# Altium PCB PCB_Main_Board_v2.0.PcbDoc (part 3 of 5)
Units mil, origin at the board's own origin, x right, y up, seen from the top; angles counter-clockwise.
Board outline 1967.5 x 1574.8 mil, 4 copper layers (Top Layer, Mid Layer 1, Mid Layer 2, Bottom Layer), stack 61.811 mil thick; 225 components, 129 nets, 854 pads, 286 vias.
Unrouted connection lines stored in the file: 2.
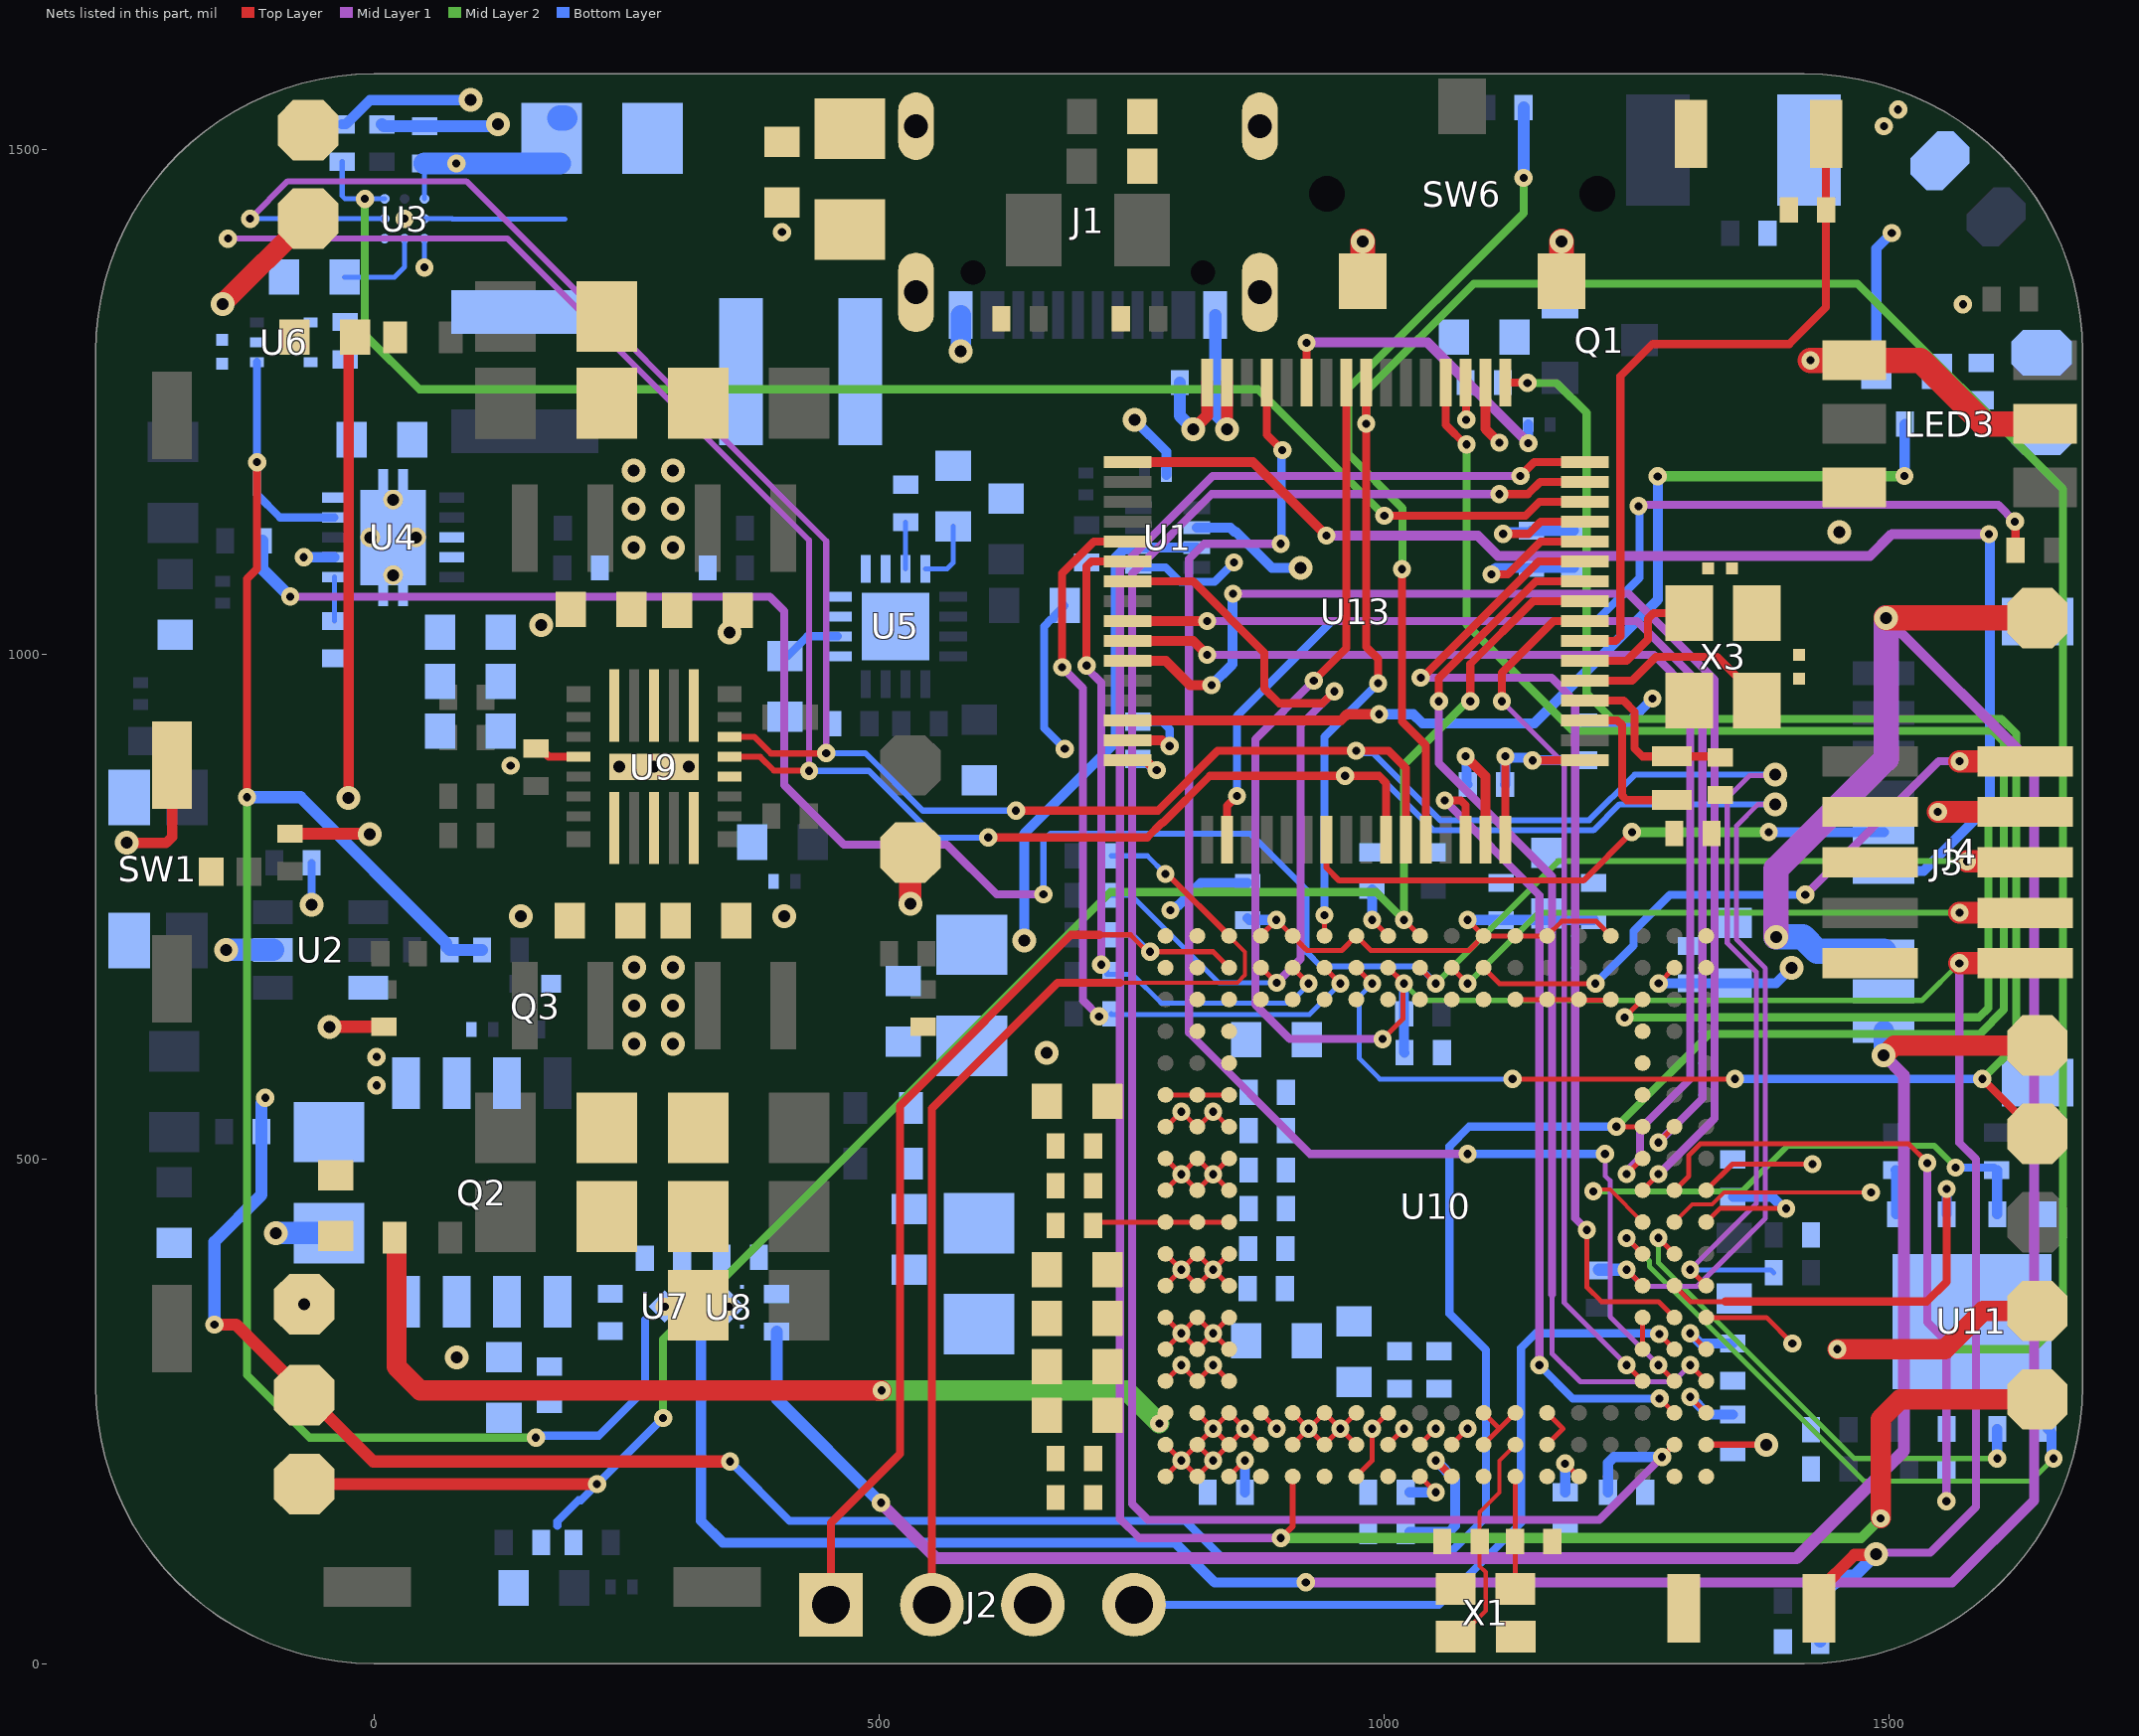
[diagram p4: the nets of this part, all layers, seen from the top]

## Part data (continued)
R2: library part RT0402FRE07510RL, "RES SMD 510 OHM 1% 1/16W 0402", Case/Package=0402, LCSC Part Number=C854355, Manufacturer=Yageo, Max Operating Temperature=125°C, Max Power Dissipation=63mW, Min Operating Temperature=-55°C, Package Quantity=10000, Supplier Part Number=13-RT0402FRE07510RLCT-ND, Temperature Coefficient=50ppm/°C, Tolerance=1%, Voltage Rating (DC)=50V, Category="Chip SMD Resistors", ComponentLink1Description=https://datasheet.ciiva.com/2561/pyu-rt-1-to-0-05-rohs-l-5-2561767.pdf?src-supplier=Digikey, ComponentLink1URL=https://datasheet.ciiva.com/2561/pyu-rt-1-to-0-05-rohs-l-5-2561767.pdf?src-supplier=Digikey, Height=0.014inch, Item Type=Resistor, Lead Free="Lead Free", Length=0.039inch, Manufacturer Part Number=RT0402FRE07510RL, Number of Terminations=2, Packaging="Tape and Reel", Pricing="1=0.1, 10=0.027, 50=0.0224, 100=0.0203, 500=0.0161, 1000=0.01443, 5000=0.01101 (USD)", RoHS=Yes, RoHS Compliant=Yes, Series=RT, Stock=19529, Supplier=Digikey, Width=0.02inch
R3 R5 R11 R15 R16 R38: library part RC0201FR-071KL, "RES 1K OHM 1% 1/20W 0201", Case Code (Imperial)=0201, Case Code (Metric)=0603, LCSC Part Number=C138165, Manufacturer=Yageo, Max Operating Temperature=125°C, Max Power Dissipation=50mW, Min Operating Temperature=-55°C, Package Quantity=10000, Resistance Tolerance=1%, Resistor Type="Thick Film", Supplier Part Number=311-1KMCT-ND, Temperature Coefficient=200ppm/°C, Voltage Rating=25V, Case/Package=0201, Category="Chip SMD Resistors", ComponentLink1Description=https://datasheet.ciiva.com/7672/1563626-7672204.pdf?src-supplier=Element14, ComponentLink1URL=https://datasheet.ciiva.com/7672/1563626-7672204.pdf?src-supplier=Element14, ComponentLink2Description=https://datasheet.ciiva.com/22698/1563626-22698505.pdf?src-supplier=Element14, ComponentLink2URL=https://datasheet.ciiva.com/22698/1563626-22698505.pdf?src-supplier=Element14, ComponentLink3Description=https://datasheet.ciiva.com/29721/pyu-r-int-thick-7-29721196.pdf?src-supplier=Digi-Key, ComponentLink3URL=https://datasheet.ciiva.com/29721/pyu-r-int-thick-7-29721196.pdf?src-supplier=Digi-Key, ComponentLink4Description=https://datasheet.ciiva.com/29721/pyu-r-int-thick-7-29721195.pdf?src-supplier=Digi-Key, ComponentLink4URL=https://datasheet.ciiva.com/29721/pyu-r-int-thick-7-29721195.pdf?src-supplier=Digi-Key, ComponentLink5Description=https://datasheet.ciiva.com/8896/pyu-rc0201-51-rohs-l-8-8896174.pdf?src-supplier=Avnet, ComponentLink5URL=https://datasheet.ciiva.com/8896/pyu-rc0201-51-rohs-l-8-8896174.pdf?src-supplier=Avnet, Construction=Rectangular, Contact Plating=Tin,Matte, Depth=0.3mm, Features="Moisture Resistant", Height=0.01inch, Item Type=Resistor, Lead Free=5697LeadFree, Length=0.024inch, Manufacturer Part Number=RC0201FR-071KL, Military Standard=Not, Number of Terminations=2, Packaging="Tape and Reel", Power Rating=50mW, Pricing="1=0.1, 10=0.027, 50=0.0172, 100=0.0143, 500=0.00988, 1000=0.00854, 5000=0.00629 (USD)", Reach SVHC Compliant=Unknown, RoHS=Yes, RoHS Compliant=Yes, Series=RC, Stock=5606340, Supplier=Digi-Key, Technology="THICK FILM", Termination=SMD/SMT, Tolerance=1%, Voltage Rating (DC)=25V, Width=0.012inch, Working Voltage=25V
R4 R9 R10 R14 R21 R22 R23 R28 R29 R30 R31 R32 R33 R34 R35 R36 R37 R40 R41 R42 R45 R49 R55 R58: library part RC0402FR-0710KL, "RES 10K OHM 1% 1/16W 0402", Case Code (Imperial)=0402, Case Code (Metric)=1005, LCSC Part Number=C60490, Manufacturer=Yageo, Max Operating Temperature=155°C, Max Power Dissipation=63mW, Min Operating Temperature=-55°C, Power Rating=62.5mW, Resistance=10kR, Resistance Tolerance=1%, Resistor Type="Thick Film", Supplier Part Number 1=603-RC0402FR-0710KL, Temperature Coefficient=100ppm/°C, Voltage Rating=50V, Case/Package=0402, Category="Chip SMD Resistors", ComponentLink1Description=https://datasheet.ciiva.com/7660/38568-7660787.pdf?src-supplier=Element14, ComponentLink1URL=https://datasheet.ciiva.com/7660/38568-7660787.pdf?src-supplier=Element14, ComponentLink2Description=https://datasheet.ciiva.com/7849/1686128-7849814.pdf?src-supplier=Element14, ComponentLink2URL=https://datasheet.ciiva.com/7849/1686128-7849814.pdf?src-supplier=Element14, ComponentLink3Description=https://datasheet.ciiva.com/7983/1018594-7983486.pdf?src-supplier=Element14, ComponentLink3URL=https://datasheet.ciiva.com/7983/1018594-7983486.pdf?src-supplier=Element14, ComponentLink4Description=https://datasheet.ciiva.com/22747/1018594-22747512.pdf?src-supplier=Element14, ComponentLink4URL=https://datasheet.ciiva.com/22747/1018594-22747512.pdf?src-supplier=Element14, ComponentLink5Description=https://datasheet.ciiva.com/12667/pyu-rc0402-51-rohs-l-6-r-12667067.pdf?src-supplier=Mouser, ComponentLink5URL=https://datasheet.ciiva.com/12667/pyu-rc0402-51-rohs-l-6-r-12667067.pdf?src-supplier=Mouser, ComponentLink6Description=https://datasheet.ciiva.com/7849/1784430-7849813.pdf?src-supplier=Element14, ComponentLink6URL=https://datasheet.ciiva.com/7849/1784430-7849813.pdf?src-supplier=Element14, ComponentLink7Description=https://datasheet.ciiva.com/7849/1784430-7849815.pdf?src-supplier=Element14, ComponentLink7URL=https://datasheet.ciiva.com/7849/1784430-7849815.pdf?src-supplier=Element14, Construction=Rectangular, Depth=0.5mm, Features="Moisture Resistant", Height=0.32mm, Item Type=Resistor, Lead Free="Lead Free", Lead Pitch=0.2mm, Length=1mm, Manufacturer Part Number=RC0402FR-0710KL, Military Standard=Not, Number of Pins=2, Number of Terminations=2, Packaging="Tape and Reel", Pricing 1="1=0.10000, 10=0.01400, 50=0.01400, 100=0.00500, 1000=0.00300, 10000=0.00200 (USD)", REACH SVHC="No SVHC", RoHS=Yes, RoHS Compliant=Yes, Series=RC, Stock 1=18648329, Supplier 1=Mouser, Termination=SMD/SMT, Tolerance=1%, Voltage Rating (DC)=50V, Width=0.5mm, Working Voltage=50V
R7: library part PA1206FRE470R01Z, "RES 0.01 OHM 1% 1W 1206", Manufacturer=Yageo, Supplier Part Number=7170942, Item Type=Resistors, Manufacturer Part Number=PA1206FRE470R01Z, Pricing="4000=0.152, 8000=0.149, 12000=0.147, 16000=0.146, 20000=0.142 (USD)", RoHS=No, Stock=4000, Supplier="Future Electronics"
R12 R18 R19 R20 R39: library part RC0402FR-074K7L, "RES 4.7K OHM 1% 1/16W 0402", Case Code (Imperial)=0402, Case Code (Metric)=1005, LCSC Part Number=C105871, Manufacturer=Yageo, Max Operating Temperature=155°C, Max Power Dissipation=63mW, Min Operating Temperature=-55°C, Power Rating=62.5mW, Resistance=4.7kR, Resistance Tolerance=1%, Resistor Type="Thick Film", Temperature Coefficient=100ppm/°C, Voltage Rating=50V, Case/Package=0402, Category="Chip SMD Resistors", ComponentLink1Description=https://datasheet.ciiva.com/22661/1686128-22661342.pdf?src-supplier=Element14, ComponentLink1URL=https://datasheet.ciiva.com/22661/1686128-22661342.pdf?src-supplier=Element14, ComponentLink2Description=https://datasheet.ciiva.com/7850/1018594-7850022.pdf?src-supplier=Element14, ComponentLink2URL=https://datasheet.ciiva.com/7850/1018594-7850022.pdf?src-supplier=Element14, ComponentLink3Description=https://datasheet.ciiva.com/7850/1018594-7850023.pdf?src-supplier=Element14, ComponentLink3URL=https://datasheet.ciiva.com/7850/1018594-7850023.pdf?src-supplier=Element14, ComponentLink4Description=https://datasheet.ciiva.com/15215/getdatasheetpartid-328119-15215035.pdf?src-supplier=Verical, ComponentLink4URL=https://datasheet.ciiva.com/15215/getdatasheetpartid-328119-15215035.pdf?src-supplier=Verical, Construction=Rectangular, Depth=0.5mm, Features="Moisture Resistant", Height=0.32mm, Height - Seated (Max)=0.016inch, Item Type=Resistor, Lead Free="Lead Free", Length=1mm, Manufacturer Part Number=RC0402FR-074K7L, Military Standard=Not, Number of Pins=2, Number of Terminations=2, Packaging="Tape and Reel", Pricing 1="10000=0.00085 (USD)", Reach SVHC Compliant=Yes, RoHS=Yes, RoHS Compliant=Yes, Series=RC, Size Code=0402, Stock 1=2420000, Supplier 1=Avnet, Supplier Part Number 1=RC0402FR-074K7L, Termination=SMD/SMT, Tolerance=1%, Voltage Rating (DC)=50V, Width=0.5mm
R13: library part RC0603FR-0720KL, "RES 20K OHM 1% 1/10W 0603", Case Code (Imperial)=0603, Case Code (Metric)=1608, LCSC Part Number=C105575, Manufacturer=Yageo, Max Operating Temperature=155°C, Max Power Dissipation=100mW, Min Operating Temperature=-55°C, Package Quantity=1, Resistance=20kR, Resistance Tolerance=1%, Resistor Type="Thick Film", Temperature Coefficient=100ppm/°C, Voltage Rating=50V, Case/Package=0603, Category="Chip SMD Resistors", ComponentLink1Description=https://datasheet.ciiva.com/11808/0900766b80f96399-11808275.pdf?src-supplier=RSComponents, ComponentLink1URL=https://datasheet.ciiva.com/11808/0900766b80f96399-11808275.pdf?src-supplier=RSComponents, ComponentLink2Description=https://datasheet.ciiva.com/22747/443971-22747525.pdf?src-supplier=Element14, ComponentLink2URL=https://datasheet.ciiva.com/22747/443971-22747525.pdf?src-supplier=Element14, ComponentLink3Description=https://datasheet.ciiva.com/2453/pyu-r-int-thick-7-2453911.pdf?src-supplier=Digi-Key, ComponentLink3URL=https://datasheet.ciiva.com/2453/pyu-r-int-thick-7-2453911.pdf?src-supplier=Digi-Key, ComponentLink4Description=https://datasheet.ciiva.com/2453/pyu-r-int-thick-7-2453912.pdf?src-supplier=Digi-Key, ComponentLink4URL=https://datasheet.ciiva.com/2453/pyu-r-int-thick-7-2453912.pdf?src-supplier=Digi-Key, ComponentLink5Description=https://datasheet.ciiva.com/2453/pyu-r-int-thick-7-2453910.pdf?src-supplier=Digi-Key, ComponentLink5URL=https://datasheet.ciiva.com/2453/pyu-r-int-thick-7-2453910.pdf?src-supplier=Digi-Key, Construction=Rectangular, Depth=0.8mm, Features="Moisture Resistant", Height=0.022inch, Item Type=Resistor, Lead Free="Lead Free", Length=0.063inch, Manufacturer Part Number=RC0603FR-0720KL, Military Standard=Not, Number of Pins=2, Number of Terminations=2, Packaging="Tape and Reel", Power Rating=100mW, Pricing 1="5000=0.00240, 10000=0.00220, 25000=0.00200, 50000=0.00190, 125000=0.00180 (USD)", REACH SVHC="No SVHC", RoHS=Yes, RoHS Compliant=Yes, Series=RC, Size Code=0603, Stock 1=945000, Supplier 1="Arrow Electronics", Supplier Part Number 1=RC0603FR-0720KL, Technology="THICK FILM", Termination=SMD/SMT, Tolerance=1%, Voltage Rating (DC)=50V, Width=0.031inch
R17: library part RC0603FR-071K96L, "RES 1.96K OHM 1% 1/10W 0603", Case Code (Imperial)=0603, Case Code (Metric)=1608, Manufacturer=Yageo, Max Operating Temperature=155°C, Max Power Dissipation=100mW, Min Operating Temperature=-55°C, Supplier Part Number=4765236, Temperature Coefficient=100ppm/°C, Tolerance=1%, Voltage Rating=75V, Voltage Rating (DC)=50V, Case/Package=0603, Category="Chip SMD Resistors", ComponentLink1Description=https://datasheet.ciiva.com/2508/pyu-r-int-thick-7-2508485.pdf?src-supplier=Digikey, ComponentLink1URL=https://datasheet.ciiva.com/2508/pyu-r-int-thick-7-2508485.pdf?src-supplier=Digikey, ComponentLink2Description=https://datasheet.ciiva.com/2508/pyu-r-int-thick-7-2508486.pdf?src-supplier=Digikey, ComponentLink2URL=https://datasheet.ciiva.com/2508/pyu-r-int-thick-7-2508486.pdf?src-supplier=Digikey, ComponentLink3Description=https://datasheet.ciiva.com/2508/pyu-r-int-thick-7-2508487.pdf?src-supplier=Digikey, ComponentLink3URL=https://datasheet.ciiva.com/2508/pyu-r-int-thick-7-2508487.pdf?src-supplier=Digikey, ComponentLink4Description=https://datasheet.ciiva.com/15189/getdatasheetpartid-327907-15189642.pdf?src-supplier=Verical, ComponentLink4URL=https://datasheet.ciiva.com/15189/getdatasheetpartid-327907-15189642.pdf?src-supplier=Verical, Construction=Rectangular, Depth=0.8mm, Features="Moisture Resistant", Height=0.45mm, Lead Free="Lead Free", Length=1.6mm, Manufacturer Part Number=RC0603FR-071K96L, Military Standard=Not, Number of Terminations=2, Packaging="Tape and Reel", Power Rating=100mW, Pricing="5000=0.0015, 50000=0.0014, 150000=0.0014, 375000=0.0013, 1000000=0.0012 (USD)", RoHS=Yes, RoHS Compliant=Yes, Series=RC, Stock=30000, Supplier="Future Electronics", Termination=SMD/SMT, Weight=7.1E-05oz, Width=0.8mm
R24 R25 R26 R27: library part CRCW04023R83FKED, "RES SMD 3.83 OHM 1% 1/16W 0402", Manufacturer="Vishay Dale", Supplier Part Number=71-CRCW04023R83FKED, Voltage Rating (DC)=50V, ComponentLink1Description=https://datasheet.ciiva.com/2464/dcrcwe3-2464766.pdf?src-supplier=Digikey, ComponentLink1URL=https://datasheet.ciiva.com/2464/dcrcwe3-2464766.pdf?src-supplier=Digikey, ComponentLink2Description=https://datasheet.ciiva.com/2464/dcrcwe3-2464767.pdf?src-supplier=Digikey, ComponentLink2URL=https://datasheet.ciiva.com/2464/dcrcwe3-2464767.pdf?src-supplier=Digikey, ComponentLink3Description=https://datasheet.ciiva.com/2464/dcrcwe3-2464765.pdf?src-supplier=Digikey, ComponentLink3URL=https://datasheet.ciiva.com/2464/dcrcwe3-2464765.pdf?src-supplier=Digikey, ComponentLink4Description=https://datasheet.ciiva.com/9076/dcrcwe3-9076442.pdf?src-supplier=Avnet, ComponentLink4URL=https://datasheet.ciiva.com/9076/dcrcwe3-9076442.pdf?src-supplier=Avnet, Item Type=Resistors, Manufacturer Part Number=CRCW04023R83FKED, Pricing="1=0.1, 10=0.023, 50=0.023, 100=0.013, 1000=0.01, 10000=0.005 (USD)", RoHS=Yes, Stock=23660, Supplier=Mouser
R43: library part RC0603FR-071ML, "RES SMD 1M OHM 1% 1/10W 0603", Case Code (Imperial)=0603, Case Code (Metric)=1608, LCSC Part Number=C105578, Manufacturer=Yageo, Max Operating Temperature=155°C, Min Operating Temperature=-55°C, Package Quantity=5000, Power Rating=100mW, Resistance=1MR, Supplier Part Number 1=311-1.00MHRDKR-ND, Temperature Coefficient=100ppm/°C, Tolerance=1%, Voltage Rating=50V, Case/Package=0603, ComponentLink1Description=http://www.farnell.com/datasheets/2167052.pdf?src-supplier=Mouser, ComponentLink1URL=http://www.farnell.com/datasheets/2167052.pdf?src-supplier=Mouser, ComponentLink2Description=http://www.farnell.com/datasheets/2167052.pdf?src-supplier=Element14, ComponentLink2URL=http://www.farnell.com/datasheets/2167052.pdf?src-supplier=Element14, ComponentLink3Description=http://documents.rs-components.com/techlib://itc_doclist_GB.htm?stockno=5048956&src-supplier=RSComponents, ComponentLink3URL=http://documents.rs-components.com/techlib://itc_doclist_GB.htm?stockno=5048956&src-supplier=RSComponents, Composition="Thick Film", Depth=0.8mm, Height=0.45mm, Item Type=Resistor, Lead Free="Lead Free", Length=1.6mm, Manufacturer Part Number=RC0603FR-071ML, Military Standard=Not, Number of Pins=2, Packaging="Tape and Reel", Pricing 1="1=0.1, 10=0.023, 100=0.0094, 1000=0.00421, 2500=0.00366 (USD)", REACH SVHC="No SVHC", Stock 1=3824601, Supplier 1=Digi-Key, Termination=SMD/SMT, Voltage Rating (DC)=50V, Width=0.8mm
R44: library part RC0402FR-070RL, "RES 0 OHM JUMPER 1/16W 0402", Case Code (Imperial)=0402, Case Code (Metric)=1005, LCSC Part Number=C106231, Manufacturer=Yageo, Max Operating Temperature=155°C, Max Power Dissipation=63mW, Min Operating Temperature=-55°C, Power Rating=62.5mW, Resistor Type="Thick Film", Supplier Part Number 1=603-RC0402FR-070RL, Temperature Coefficient=200ppm/°C, Tolerance=1%, Voltage Rating=50V, Case/Package=0402, Category="Chip SMD Resistors", ComponentLink1Description=https://datasheet.ciiva.com/8896/pyu-rc0402-51-rohs-l-6-8896149.pdf?src-supplier=Avnet, ComponentLink1URL=https://datasheet.ciiva.com/8896/pyu-rc0402-51-rohs-l-6-8896149.pdf?src-supplier=Avnet, ComponentLink2Description=https://datasheet.ciiva.com/16790/pyu-rc0402-51-rohs-l-6-r-16790444.pdf?src-supplier=Future+Electronics, ComponentLink2URL=https://datasheet.ciiva.com/16790/pyu-rc0402-51-rohs-l-6-r-16790444.pdf?src-supplier=Future+Electronics, Contact Plating=Tin,Matte, Features="Moisture Resistant", Height=0.35mm, Lead Free="Lead Free", Length=1mm, Manufacturer Part Number=RC0402FR-070RL, Mount="Surface Mount", Number of Terminations=2, Packaging="Tape and Reel", Pricing 1="1=0.10000, 10=0.01400, 50=0.01400, 100=0.00600, 1000=0.00300, 5000=0.00200, 10000=0.00100 (USD)", Radiation Hardening=No, Resistance=0R, RoHS=Yes, RoHS Compliant=Yes, Series=RC, Size Code=0402, Stock 1=8556842, Supplier 1=Mouser, Termination=SMD/SMT, Width=0.5mm
R46 R56: library part 0201WMF7871TEE, "50mW Thick Film Resistors ±1% 7.87kΩ 0201 Chip Resistor - Surface Mount ROHS", LCSC Part Number=C473937, Manufacturer="UNI-ROYAL(Uniroyal Elec)", Package=0201, ComponentLink1Description=LCSC, ComponentLink1URL=https://www.lcsc.com/product-detail/Chip-span-style-background-color-ff0-Resistor-span-Surface-Mount_UNI-ROYAL-Uniroyal-Elec-0201WMF7871TEE_C473937.html, Item Type=Resistor, Manufacturer Part Number=0201WMF7871TEE
R47 R50 R57: library part 0603WAD8202T5E, "82kΩ 0603 Chip Resistor - Surface Mount ROHS", LCSC Part Number=C407560, Manufacturer=UNI-ROYAL, ComponentLink1Description=LCSC, ComponentLink1URL=https://lcsc.com/product-detail/Chip-span-style-background-color-ff0-Resistor-span-Surface-Mount_UNI-ROYAL-Uniroyal-Elec-0603WAD8202T5E_C407560.html, Item Type=Resistor, Manufacturer Part Number=0603WAD8202T5E
R48 R54: library part RT0805BRD07750RL, "RES SMD 750 OHM 0.1% 1/8W 0805", Case Code (Imperial)=0805, Case Code (Metric)=2012, LCSC Part Number=C728656, Manufacturer=Yageo, Max Operating Temperature=125°C, Max Power Dissipation=125mW, Min Operating Temperature=-55°C, Package Quantity=5000, Resistor Type="Thin Film", Temperature Coefficient=25ppm/°C, Tolerance=0.1%, Voltage Rating=150V, Case/Package=0805, Category="Chip SMD Resistors", ComponentLink1Description=https://datasheet.ciiva.com/2585/pyu-rt-1-to-0-05-rohs-l-5-2585169.pdf?src-supplier=Digi-Key, ComponentLink1URL=https://datasheet.ciiva.com/2585/pyu-rt-1-to-0-05-rohs-l-5-2585169.pdf?src-supplier=Digi-Key, ComponentLink2Description=https://datasheet.ciiva.com/8884/pyu-rt-1-to-0-05-rohs-l-4-8884854.pdf?src-supplier=Avnet, ComponentLink2URL=https://datasheet.ciiva.com/8884/pyu-rt-1-to-0-05-rohs-l-4-8884854.pdf?src-supplier=Avnet, Construction=Rectangular, Contact Plating=Tin,Matte, Depth=1.25mm, Height=0.024inch, Item Type=Resistor, Lead Free="Lead Free", Length=2mm, Manufacturer Part Number=RT0805BRD07750RL, Military Standard=Not, Number of Terminations=2, Packaging="Tape and Reel", Power Rating=125mW, Pricing 1="1=0.33450, 10=0.24070, 25=0.22900, 100=0.09650, 250=0.09470, 500=0.06880, 1000=0.04610, 3000=0.03410 (USD)", Radiation Hardening=No, Resistance=750R, RoHS=Yes, RoHS Compliant=Yes, Series=RT, Stock 1=5653, Supplier 1="Arrow Electronics", Supplier Part Number 1=RT0805BRD07750RL, Termination=SMD/SMT, Voltage Rating (DC)=150V, Weight=0.000194oz, Width=0.049inch
R59 R61: library part RN73H1ETTP80R6F50, "Res 80.6 Ohm 1% 1/16W 0402", Case Code (Imperial)=0402, Case Code (Metric)=1005, Manufacturer="KOA Speer", Max Operating Temperature=155°C, Min Operating Temperature=-55°C, Power Rating=63mW, Supplier Part Number=2019-RN73H1ETTP80R6F50CT-ND, Temperature Coefficient=50ppm/°C, Tolerance=1%, Voltage Rating=50V, Case/Package=0402, ComponentLink1Description=http://www.mouser.com/ds/2/219/RN73H-12200.pdf?src-supplier=Mouser, ComponentLink1URL=http://www.mouser.com/ds/2/219/RN73H-12200.pdf?src-supplier=Mouser, Height=0.35mm, Item Type=Resistor, Length=1mm, Manufacturer Part Number=RN73H1ETTP80R6F50, Packaging="Tape and Reel", Pricing="1000=0.08675 (USD)", RoHS=Yes, RoHS Compliant=Yes, Series=RN73H, Supplier=Digikey, Termination=SMD/SMT, Voltage Rating (DC)=50V, Weight=2.3E-05oz, Width=0.5mm
R60: library part RN73H1ETTP2800D50, "RES 280 OHM 0.5% 1/16W 0402", Case Code (Imperial)=0402, Case Code (Metric)=1005, Manufacturer="KOA Speer", Max Operating Temperature=155°C, Min Operating Temperature=-55°C, Power Rating=63mW, Supplier Part Number=2019-RN73H1ETTP2800D50CT-ND, Temperature Coefficient=50ppm/°C, Tolerance=0.5%, Voltage Rating=50V, Case/Package=0402, ComponentLink1Description=http://www.koaspeer.com/catimages/Products/RN73H/RN73H.pdf?src-supplier=Mouser, ComponentLink1URL=http://www.koaspeer.com/catimages/Products/RN73H/RN73H.pdf?src-supplier=Mouser, Height=0.35mm, Item Type=Resistor, Length=1mm, Manufacturer Part Number=RN73H1ETTP2800D50, Packaging="Tape and Reel", Pricing="1000=0.08675 (USD)", RoHS=Yes, RoHS Compliant=Yes, Series=RN73H, Supplier=Digikey, Termination=SMD/SMT, Voltage Rating (DC)=50V, Width=0.5mm
SW1: "SWITCH TACTILE SPST-NO 0.05A 12V", Actuator Color=Black, Case/Package=SMD/SMT, Contact Current Rating=50mA, Contact Resistance=500mR, LCSC Part Number=C79167, Manufacturer=Panasonic, Max Operating Temperature=70°C, Max Voltage Rating (DC)=12V, Min Operating Temperature=-20°C, Operating Force=2.2N, Package Quantity=5000, Supplier Part Number=667-EVQP7A01P, Actuator Length=0.65mm, Category="Tactile Switches", ComponentLink1Description=http://uk.rs-online.com/webdocs/13a5/0900766b813a5dbe.pdf?src-supplier=Rs, ComponentLink1URL=http://uk.rs-online.com/webdocs/13a5/0900766b813a5dbe.pdf?src-supplier=Rs, ComponentLink2Description=http://datasheet.octopart.com/EVQ-P7A01P-Panasonic-datasheet-98950114.pdf?src-supplier=Rs, ComponentLink2URL=http://datasheet.octopart.com/EVQ-P7A01P-Panasonic-datasheet-98950114.pdf?src-supplier=Rs, ComponentLink3Description=https://www3.panasonic.biz/ac/e_download/control/switch/light-touch/catalog/sw_lt_eng_3529s_side.pdf?src-supplier=Verical, ComponentLink3URL=https://www3.panasonic.biz/ac/e_download/control/switch/light-touch/catalog/sw_lt_eng_3529s_side.pdf?src-supplier=Verical, ComponentLink4Description=https://www3.panasonic.biz/ac/e_download/control/switch/light-touch/catalog/sw_lt_eng_3529s_side.pdf?src-supplier=Onlinecomponents.com, ComponentLink4URL=https://www3.panasonic.biz/ac/e_download/control/switch/light-touch/catalog/sw_lt_eng_3529s_side.pdf?src-supplier=Onlinecomponents.com, ComponentLink5Description=https://www3.panasonic.biz/ac/e_download/control/switch/light-touch/catalog/sw_lt_eng_3529s_side.pdf?src-supplier=Arrow+Electronics, ComponentLink5URL=https://www3.panasonic.biz/ac/e_download/control/switch/light-touch/catalog/sw_lt_eng_3529s_side.pdf?src-supplier=Arrow+Electronics, ComponentLink6Description=https://www3.panasonic.biz/ac/e_download/control/switch/light-touch/catalog/sw_lt_eng_3529s_side.pdf?src-supplier=Avnet, ComponentLink6URL=https://www3.panasonic.biz/ac/e_download/control/switch/light-touch/catalog/sw_lt_eng_3529s_side.pdf?src-supplier=Avnet, ComponentLink7Description=http://www.farnell.com/datasheets/1790605.pdf?src-supplier=Newark, ComponentLink7URL=http://www.farnell.com/datasheets/1790605.pdf?src-supplier=Newark, ComponentLink8Description=https://datasheet.octopart.com/EVQ-P7A01P-Panasonic-datasheet-98950114.pdf?src-supplier=Future+Electronics, ComponentLink8URL=https://datasheet.octopart.com/EVQ-P7A01P-Panasonic-datasheet-98950114.pdf?src-supplier=Future+Electronics, ComponentLink9Description=https://www3.panasonic.biz/ac/e_download/control/switch/light-touch/catalog/sw_lt_eng_3529s_side.pdf?src-supplier=Mouser, ComponentLink9URL=https://www3.panasonic.biz/ac/e_download/control/switch/light-touch/catalog/sw_lt_eng_3529s_side.pdf?src-supplier=Mouser, ComponentLink10Description=https://www3.panasonic.biz/ac/e_download/control/switch/light-touch/catalog/sw_lt_eng_3529s_side.pdf?src-supplier=Allied+Electronics, ComponentLink10URL=https://www3.panasonic.biz/ac/e_download/control/switch/light-touch/catalog/sw_lt_eng_3529s_side.pdf?src-supplier=Allied+Electronics, ComponentLink11Description=http://datasheet.octopart.com/EVQ-P7A01P-Panasonic-datasheet-98950114.pdf?src-supplier=Future+Electronics, ComponentLink11URL=http://datasheet.octopart.com/EVQ-P7A01P-Panasonic-datasheet-98950114.pdf?src-supplier=Future+Electronics, ComponentLink12Description=http://datasheet.octopart.com/EVQ-P7A01P-Panasonic-datasheet-98950114.pdf?src-supplier=Distrelec, ComponentLink12URL=http://datasheet.octopart.com/EVQ-P7A01P-Panasonic-datasheet-98950114.pdf?src-supplier=Distrelec, ComponentLink13Description=http://datasheet.octopart.com/EVQ-P7A01P-Panasonic-datasheet-98950114.pdf?src-supplier=Farnell, ComponentLink13URL=http://datasheet.octopart.com/EVQ-P7A01P-Panasonic-datasheet-98950114.pdf?src-supplier=Farnell, ComponentLink14Description=http://www.farnell.com/datasheets/1790605.pdf?src-supplier=Element14, ComponentLink14URL=http://www.farnell.com/datasheets/1790605.pdf?src-supplier=Element14, ComponentLink15Description=http://industrial.panasonic.com/www-data/pdf/ATK0000/ATK0000CE20.pdf?src-supplier=Farnell, ComponentLink15URL=http://industrial.panasonic.com/www-data/pdf/ATK0000/ATK0000CE20.pdf?src-supplier=Farnell, ComponentLink16Description=http://datasheet.octopart.com/EVQ-P7A01P-Panasonic-datasheet-98950114.pdf?src-supplier=Newark, ComponentLink16URL=http://datasheet.octopart.com/EVQ-P7A01P-Panasonic-datasheet-98950114.pdf?src-supplier=Newark, ComponentLink17Description=https://datasheet.octopart.com/EVQ-P7A01P-Panasonic-datasheet-22087671.pdf?src-supplier=Electro+Sonic, ComponentLink17URL=https://datasheet.octopart.com/EVQ-P7A01P-Panasonic-datasheet-22087671.pdf?src-supplier=Electro+Sonic, ComponentLink18Description=http://datasheet.octopart.com/EVQ-P7A01P-Panasonic-datasheet-98950114.pdf?src-supplier=Quest, ComponentLink18URL=http://datasheet.octopart.com/EVQ-P7A01P-Panasonic-datasheet-98950114.pdf?src-supplier=Quest, ComponentLink19Description=https://www3.panasonic.biz/ac/e_download/control/switch/light-touch/catalog/sw_lt_eng_3529s_side.pdf?src-supplier=TTI, ComponentLink19URL=https://www3.panasonic.biz/ac/e_download/control/switch/light-touch/catalog/sw_lt_eng_3529s_side.pdf?src-supplier=TTI, ComponentLink20Description=https://www3.panasonic.biz/ac/e_download/control/switch/light-touch/catalog/sw_lt_eng_3529s_side.pdf?src-supplier=NAC+Semi, ComponentLink20URL=https://www3.panasonic.biz/ac/e_download/control/switch/light-touch/catalog/sw_lt_eng_3529s_side.pdf?src-supplier=NAC+Semi, Electrical Life=100000Cycles, Illumination Type=Non-Illuminated, Item Type="Tactile Switch", Lead Free="Lead Free", Manufacturer Part Number=EVQ-P7A01P, Mechanical Life=100000Cycles, Mounting Technology="Surface Mount", Orientation="Right Angle", Packaging="Tape and Reel", Pricing="1=0.28, 10=0.258, 50=0.258, 100=0.213, 1000=0.169, 10000=0.133 (USD)", Radiation Hardening=No, Reach SVHC Compliant=Unknown, RoHS=Yes, Series=EVQP7, Stock=47904, Supplier=Mouser, Switch Function=Off-Mom, Switch Travel=0.2mm, Termination="Gull Wing", Throw Configuration=SPST
SW2 SW7: "SWITCH TACTILE SPST-NO 0.05A 12V", Contact Current Rating=50mA, Contact Resistance=100mR, Insulation Resistance=100MR, LCSC Part Number=C231329, Manufacturer=Omron, Max Operating Temperature=70°C, Max Voltage Rating (DC)=12V, Min Operating Temperature=-25°C, Operating Force=1.5N, Package Quantity=1, Ratings="Dust Proof,IP40", Supplier Part Number 1=SW1020DKR-ND, Actuator Length=0.4mm, Actuator Type=Standard, ComponentLink1Description=http://www.farnell.com/datasheets/60838.pdf?src-supplier=Farnell, ComponentLink1URL=http://www.farnell.com/datasheets/60838.pdf?src-supplier=Farnell, ComponentLink2Description=http://www.farnell.com/datasheets/60838.pdf?src-supplier=Element14, ComponentLink2URL=http://www.farnell.com/datasheets/60838.pdf?src-supplier=Element14, ComponentLink3Description=https://omronfs.omron.com/en_US/ecb/products/pdf/en-b3u.pdf?src-supplier=Digi-Key, ComponentLink3URL=https://omronfs.omron.com/en_US/ecb/products/pdf/en-b3u.pdf?src-supplier=Digi-Key, ComponentLink4Description=http://www.omron.com/ecb/products/pdf/en-b3u.pdf?src-supplier=Digi-Key, ComponentLink4URL=http://www.omron.com/ecb/products/pdf/en-b3u.pdf?src-supplier=Digi-Key, ComponentLink5Description=https://www.distrelec.biz/Web/Downloads/he/et/B3U_eng_datasheet.pdf?mime=application%2Fpdf&src-supplier=Distrelec, ComponentLink5URL=https://www.distrelec.biz/Web/Downloads/he/et/B3U_eng_datasheet.pdf?mime=application%2Fpdf&src-supplier=Distrelec, ComponentLink6Description=http://www.onlinecomponents.com/productFiles/mf-OM/en-b3u.pdf?src-supplier=Onlinecomponents.com, ComponentLink6URL=http://www.onlinecomponents.com/productFiles/mf-OM/en-b3u.pdf?src-supplier=Onlinecomponents.com, ComponentLink7Description=https://www.verical.com/server-webapp/html/getDatasheet?partID=552554&src-supplier=Verical, ComponentLink7URL=https://www.verical.com/server-webapp/html/getDatasheet?partID=552554&src-supplier=Verical, ComponentLink8Description=http://www.farnell.com/datasheets/1685550.pdf?src-supplier=Element14, ComponentLink8URL=http://www.farnell.com/datasheets/1685550.pdf?src-supplier=Element14, ComponentLink9Description=http://www.farnell.com/datasheets/2610940.pdf?src-supplier=Farnell, ComponentLink9URL=http://www.farnell.com/datasheets/2610940.pdf?src-supplier=Farnell, ComponentLink10Description=https://www.alliedelec.com/m/d/4c8a9ef82804fc3c241a13c1e298fd73.pdf?src-supplier=Allied+Electronics, ComponentLink10URL=https://www.alliedelec.com/m/d/4c8a9ef82804fc3c241a13c1e298fd73.pdf?src-supplier=Allied+Electronics, Contact Material=Silver, Current Rating=50mA, Depth=2.5mm, Electrical Life=200000Cycles, Height=1.2mm, Illumination Type=Non-Illuminated,Illuminated, Item Type=Switch, Lead Free="Lead Free", Length=4mm, Manufacturer Part Number=B3U-1000P, Max Current Rating=50mA, Mechanical Life=200000Cycles, Mount="Surface Mount", Orientation=Straight, Packaging="Tape and Reel", Pricing 1="1=1, 10=0.961, 25=0.9064, 50=0.7976, 100=0.7251, 250=0.68888, 500=0.67074, 1000=0.52571 (USD)", REACH SVHC=Unknown, Stock 1=116454, Supplier 1=Digi-Key, Switch Function=Off-Mom, Switch Travel=0.15mm, Termination=SMD/SMT, Throw Configuration=SPST, Voltage Rating (DC)=12V, Weight=0.000776oz, Width=3mm
SW3 SW4 SW5: "SPST Black Flat dial, raised type 2.54mm 1 SMD,2.5x6mm DIP Switches ROHS", LCSC Part Number=C54948, Manufacturer=DongGuan, Package=SMD,2.5x6mm, ComponentLink1Description=LCSC, ComponentLink1URL=https://www.lcsc.com/product-detail/DIP-Switches_DongGuan-KINGTEK-Industrial-Co-LTD-DSIC01LSGET_C54948.html, Item Type=Switch, Manufacturer Part Number=DSIC01LSGET
SW6: "SWITCH SLIDE SPDT 200MA 12V", LCSC Part Number=C2921648, Manufacturer="Nidec Copal", Max Operating Temperature=85°C, Min Operating Temperature=-40°C, Operating Force=153gf, Supplier Part Number=563-1319-1-ND, Voltage Rating (DC)=12V, Actuator Length=2mm, Actuator Material=Nylon,Polyamide, Actuator Type=Standard, Category="Slide Switches", ComponentLink1Description=https://datasheet.ciiva.com/6461/cl-sb-6461724.pdf?src-supplier=Digikey, ComponentLink1URL=https://datasheet.ciiva.com/6461/cl-sb-6461724.pdf?src-supplier=Digikey, ComponentLink2Description=https://datasheet.ciiva.com/6461/cl-sb-6461725.pdf?src-supplier=Digikey, ComponentLink2URL=https://datasheet.ciiva.com/6461/cl-sb-6461725.pdf?src-supplier=Digikey, ComponentLink3Description=https://datasheet.ciiva.com/6461/cl-sb-6461726.pdf?src-supplier=Digikey, ComponentLink3URL=https://datasheet.ciiva.com/6461/cl-sb-6461726.pdf?src-supplier=Digikey, Contact Material=Copper, Contact Plating=Gold, Electrical Life=10000Cycles, Item Type="Slide Switche", Manufacturer Part Number=CL-SB-12B-02T, Mounting Technology="Surface Mount", Packaging="Cut Tape", Pricing="1=1.67, 10=1.62, 25=1.4732, 100=1.2799, 250=1.15988 (USD)", RoHS=Yes, RoHS Compliant=Yes, Series=CL-SB, Stock=2449, Supplier=Digikey, Switch Function=On-On, Switch Travel=2mm, Termination="Gull Wing", Throw Configuration=SPDT
TP1 TP3: "Wire Connecting Pad", Item Type="Test Point", Manufacturer Part Number="2 Test Pad"
TP2 TP4 TP5 TP6 TP7 TP8 TP9 TP10 TP11 TP12 TP13 TP14 TP15: "Test Point ON", Item Type="TEST POINT"
U1: "1.6-V TO 5.5-V, 20-M, 4-A LOW IQ", Manufacturer="Texas Instruments", Supplier Part Number=595-TPS2117DRLR, Height=600um, Item Type=IC, Length=2.1mm, Manufacturer Part Number=TPS2117DRLR, Pins=8, Pricing="1=1.34, 10=1.2, 50=1.2, 100=0.938, 1000=0.612, 10000=0.522 (USD)", RoHS=No, Stock=3415, Supplier=Mouser, Thickness=550um, Width=1.2mm
U2: "IC CNTRLR ON/OFF W/DEB TSOT23-6", Case/Package=SOT-23-6, LCSC Part Number=C79401, Manufacturer=Maxim, Max Operating Temperature=125°C, Max Power Dissipation=727W, Max Supply Voltage=5.5V, Min Operating Temperature=-40°C, Min Supply Voltage=2.7V, Number of Voltages Monitored=1, Operating Supply Current=7uA, Undervoltage Threshold=1.8V, Category="Interface ICs", ComponentLink1Description=https://datasheet.ciiva.com/4901/max16054-83881-4901086.pdf?src-supplier=Mouser, ComponentLink1URL=https://datasheet.ciiva.com/4901/max16054-83881-4901086.pdf?src-supplier=Mouser, ComponentLink2Description=https://datasheet.ciiva.com/1784/max16054-1784560.pdf?src-supplier=Digi-Key, ComponentLink2URL=https://datasheet.ciiva.com/1784/max16054-1784560.pdf?src-supplier=Digi-Key, ComponentLink3Description=https://datasheet.ciiva.com/14247/max16054-14247770.pdf?src-supplier=Avnet, ComponentLink3URL=https://datasheet.ciiva.com/14247/max16054-14247770.pdf?src-supplier=Avnet, ComponentLink4Description=https://datasheet.ciiva.com/1784/max16054-1784561.pdf?src-supplier=Digi-Key, ComponentLink4URL=https://datasheet.ciiva.com/1784/max16054-1784561.pdf?src-supplier=Digi-Key, ComponentLink5Description=https://datasheet.ciiva.com/1784/max16054-1784562.pdf?src-supplier=Digi-Key, ComponentLink5URL=https://datasheet.ciiva.com/1784/max16054-1784562.pdf?src-supplier=Digi-Key, Contact Plating=Tin,Matte, Height=0.73mm, Item Type=IC, Length=4mm, Manufacturer Part Number=MAX16054AZT+T, Mounting Technology="Surface Mount", Output Type=PUSH-PULL, Package Quantity=1, Packaging="Tape and Reel", Pins=6, Pricing 1="1=2.99700 (USD)", Radiation Hardening=No, RoHS=Yes, RoHS Compliant=Yes, Series=-, Stock 1=3, Supplier 1="Arrow Electronics", Supplier Part Number 1=MAX16054AZT+T, Watchdog Timer=No, Width=4mm
U3: "IC FUEL GAUGE LI-ION 1CL 9DSBGA", LCSC Part Number=C165137, Manufacturer="Texas Instruments", Supplier Part Number=595-BQ27426YZFR, Category="Battery Management", ComponentLink1Description=http://www.ti.com/lit/pdf/sluubb0?src-supplier=Digikey, ComponentLink1URL=http://www.ti.com/lit/pdf/sluubb0?src-supplier=Digikey, ComponentLink2Description=http://www.ti.com/lit/gpn/bq27426?src-supplier=Mouser, ComponentLink2URL=http://www.ti.com/lit/gpn/bq27426?src-supplier=Mouser, Item Type=IC, Manufacturer Part Number=BQ27426YZFR, Pricing="1=1.63, 10=1.47, 50=1.47, 100=1.18, 1000=0.877, 10000=0.694 (USD)", RoHS=Yes, Stock=3166, Supplier=Mouser
U4: "IC REG BOOST 5V 5A 10VSON", Manufacturer="Texas Instruments", Supplier Part Number=595-TPS61232DRCR, ComponentLink1Description=http://www.ti.com/lit/ds/symlink/tps61232.pdf?src-supplier=Digikey, ComponentLink1URL=http://www.ti.com/lit/ds/symlink/tps61232.pdf?src-supplier=Digikey, ComponentLink2Description=http://www.ti.com/general/docs/suppproductinfo.tsp?distId=10&amp;gotoUrl=http%3A%2F%2Fwww.ti.com%2Flit%2Fgpn%2Ftps61232&src-supplier=Digikey, ComponentLink2URL=http://www.ti.com/general/docs/suppproductinfo.tsp?distId=10&amp;gotoUrl=http%3A%2F%2Fwww.ti.com%2Flit%2Fgpn%2Ftps61232&src-supplier=Digikey, Item Type=IC, Manufacturer Part Number=TPS61232DRCR, Pricing="1=2.74, 10=2.33, 50=2.33, 100=1.98, 1000=1.35, 10000=1.2 (USD)", RoHS=Yes, Stock=2057, Supplier=Mouser
U5: "IC BATT CHG LI-ION 1CELL 16WQFN", Manufacturer="Texas Instruments", Supplier Part Number=595-BQ25302RTER, Item Type="Integrated Circuits (ICs)", Manufacturer Part Number=BQ25302RTER, Pricing="1=1.21, 10=1.03, 50=1.03, 100=0.824, 1000=0.709, 10000=0.661 (USD)", RoHS=Yes, Stock=6794, Supplier=Mouser
U6: "Active Low 1 VSOF-5 Monitors & Reset Circuits ROHS", Case/Package=VSOF, LCSC Part Number=C2067200, Manufacturer=Rohm, Max Operating Temperature=105°C, Max Power Dissipation=210mW, Max Reset Threshold Voltage=6.09V, Max Supply Current=1.98uA, Max Supply Voltage=10V, Min Operating Temperature=-40°C, Min Reset Threshold Voltage=5.91V, Min Supply Voltage=1.2V, Number of Voltages Monitored=1, Operating Supply Current=900nA, Package Quantity=3000, Supplier Part Number 1=1717448, Threshold Voltage=6V, Accuracy=1%, Category="Voltage Supervisors", ComponentLink1Description=https://datasheet.ciiva.com/1974/bd48xxg-e-1974994.pdf?src-supplier=Digi-Key, ComponentLink1URL=https://datasheet.ciiva.com/1974/bd48xxg-e-1974994.pdf?src-supplier=Digi-Key, ComponentLink2Description=https://datasheet.ciiva.com/8133/bd48xxg-e-8133113.pdf?src-supplier=Avnet, ComponentLink2URL=https://datasheet.ciiva.com/8133/bd48xxg-e-8133113.pdf?src-supplier=Avnet, ComponentLink3Description=LCSC, ComponentLink3URL=https://www.lcsc.com/product-detail/Monitors-Reset-Circuits_ROHM-Semicon-BD4830FVE-TR_C2067200.html, Item Type=IC, Lead Free="Lead Free", Manufacturer Part Number=BD4830FVE-TR, Mounting Technology="Surface Mount", Number of Monitored Inputs=1, Packaging="Tape and Reel", Pins=5, Pricing 1="1=0.64000, 10=0.54900, 25=0.51200, 100=0.40960, 250=0.38032, 500=0.32182, 1000=0.24868 (USD)", Reset="Active Low", RoHS=Yes, RoHS Compliant=Yes, Series=BD48xxx, Stock 1=5990, Supplier 1=Rs, Type="Simple Reset/Power-On Reset,Voltage Detector", Watchdog Timer=No
U7: "IC REG LINEAR 3.3V 700MA 4XDFN", Manufacturer="ON Semiconductor", Supplier Part Number=4107897, ComponentLink1Description=http://www.farnell.com/datasheets/2711391.pdf?src-supplier=Farnell, ComponentLink1URL=http://www.farnell.com/datasheets/2711391.pdf?src-supplier=Farnell, ComponentLink2Description=http://www.farnell.com/datasheets/2711391.pdf?src-supplier=Newark, ComponentLink2URL=http://www.farnell.com/datasheets/2711391.pdf?src-supplier=Newark, ComponentLink3Description=https://www.onsemi.com/pub/Collateral/NCP167-D.PDF?src-supplier=Digikey, ComponentLink3URL=https://www.onsemi.com/pub/Collateral/NCP167-D.PDF?src-supplier=Digikey, ComponentLink4Description=https://datasheet.octopart.com/NCP167BMX330TBG-ON-Semiconductor-datasheet-138898180.pdf?src-supplier=Future+Electronics, ComponentLink4URL=https://datasheet.octopart.com/NCP167BMX330TBG-ON-Semiconductor-datasheet-138898180.pdf?src-supplier=Future+Electronics, ComponentLink5Description=https://datasheet.octopart.com/NCP167BMX330TBG-ON-Semiconductor-datasheet-138887418.pdf?src-supplier=TME, ComponentLink5URL=https://datasheet.octopart.com/NCP167BMX330TBG-ON-Semiconductor-datasheet-138887418.pdf?src-supplier=TME, Item Type=IC, Manufacturer Part Number=NCP167BMX330TBG, Pricing="5000=0.184, 10000=0.178 (USD)", RoHS=Yes, Stock=5000, Supplier="Future Electronics"
U8: "IC REG LINEAR 1.8V 450MA 4XDFN", Manufacturer="ON Semiconductor", Supplier Part Number=NCP161BMX180TBGOSCT-ND, ComponentLink1Description=http://www.farnell.com/datasheets/2236904.pdf?src-supplier=Farnell, ComponentLink1URL=http://www.farnell.com/datasheets/2236904.pdf?src-supplier=Farnell, ComponentLink2Description=http://www.mouser.com/ds/2/308/NCP161-D-466765.pdf?src-supplier=Mouser, ComponentLink2URL=http://www.mouser.com/ds/2/308/NCP161-D-466765.pdf?src-supplier=Mouser, ComponentLink3Description=http://www.onsemi.com/pub/Collateral/NCP161-D.PDF?src-supplier=Digikey, ComponentLink3URL=http://www.onsemi.com/pub/Collateral/NCP161-D.PDF?src-supplier=Digikey, ComponentLink4Description=https://www.onsemi.com/pub/Collateral/NCP161-D.PDF?src-supplier=Digikey, ComponentLink4URL=https://www.onsemi.com/pub/Collateral/NCP161-D.PDF?src-supplier=Digikey, ComponentLink5Description=http://www.farnell.com/datasheets/2236904.pdf?src-supplier=Newark, ComponentLink5URL=http://www.farnell.com/datasheets/2236904.pdf?src-supplier=Newark, Item Type=IC, Manufacturer Part Number=NCP161BMX180TBG, Pricing="1=0.4, 10=0.328, 25=0.3, 100=0.2024, 250=0.16748, 500=0.15354, 1000=0.11516, 2500=0.10818 (USD)", RoHS=Yes, Stock=9231, Supplier=Digikey
U9: "IC REG BUCK ADJ QUAD 26VQFN", Manufacturer="Texas Instruments", Supplier Part Number=595-LP87524JRNFRQ1, ComponentLink1Description=http://www.ti.com/general/docs/suppproductinfo.tsp?distId=10&amp;gotoUrl=http%3A%2F%2Fwww.ti.com%2Flit%2Fgpn%2Flp87524j-q1&src-supplier=Digikey, ComponentLink1URL=http://www.ti.com/general/docs/suppproductinfo.tsp?distId=10&amp;gotoUrl=http%3A%2F%2Fwww.ti.com%2Flit%2Fgpn%2Flp87524j-q1&src-supplier=Digikey, Item Type=IC, Manufacturer Part Number=LP87524JRNFRQ1, Pins=26NUMBER, Pricing="1=5.94, 10=5.2, 50=5.2, 100=4.37, 1000=3.14, 10000=2.91 (USD)", RoHS=Yes, Stock=3780, Supplier=Mouser, Thickness=900um
U10: "RF System on a Chip - SoC Single-chip 76-GHz to 81-GHz automotive radar sensor integrating antenna on package, DSP and MCU 180-FCCSP -40 to 125", Case/Package=107Case, Manufacturer="Texas Instruments", Supplier Part Number=595-AWR1843ARBGALPQ1, Category="Integrated Circuits (ICs)", Height=965um, Item Type=IC, Length=15mm, Manufacturer Part Number=AWR1843ARBGALPQ1, Pins=180NUMBER, Pricing="1=46.9, 10=43.76, 50=40.61, 100=37.99, 1000=37.99, 10000=37.99 (USD)", RoHS=No, Stock=118, Supplier=Mouser, Thickness=965um, Width=15mm
U11: "IC FLASH 16MBIT SPI/QUAD 8WSON", Manufacturer=Macronix, Supplier Part Number=1092-MX25V1635FZNQ03-ND, Category=Flash, Item Type=IC, Manufacturer Part Number=MX25V1635FZNQ03, Pricing="1=1.12, 10=1.017, 25=0.99, 40=0.98475, 80=0.88038, 230=0.87778, 570=0.86453, 1140=0.82783, 5130=0.77074 (USD)", RoHS=No, Stock=7952, Supplier=Digikey
U13: "IC MCU 32BIT 256KB FLASH 64LQFP", Manufacturer=STMicroelectronics, Supplier Part Number 1=511-STM32L433RCT6, Category=Microcontrollers, ComponentLink1Description=http://www.farnell.com/datasheets/2581765.pdf?src-supplier=Farnell, ComponentLink1URL=http://www.farnell.com/datasheets/2581765.pdf?src-supplier=Farnell, ComponentLink2Description=http://www.farnell.com/datasheets/2581765.pdf?src-supplier=Element14, ComponentLink2URL=http://www.farnell.com/datasheets/2581765.pdf?src-supplier=Element14, ComponentLink3Description=http://www.farnell.com/datasheets/2581765.pdf?src-supplier=Newark, ComponentLink3URL=http://www.farnell.com/datasheets/2581765.pdf?src-supplier=Newark, ComponentLink4Description=http://www.st.com/content/ccc/resource/technical/document/reference_manual/group0/b0/ac/3e/8f/6d/21/47/af/DM00151940/files/DM00151940.pdf/jcr:content/translations/en.DM00151940.pdf?src-supplier=Digikey, ComponentLink4URL=http://www.st.com/content/ccc/resource/technical/document/reference_manual/group0/b0/ac/3e/8f/6d/21/47/af/DM00151940/files/DM00151940.pdf/jcr:content/translations/en.DM00151940.pdf?src-supplier=Digikey, ComponentLink5Description=https://datasheet.octopart.com/STM32L433RCT6-STMicroelectronics-datasheet-62336854.pdf?src-supplier=Future+Electronics, ComponentLink5URL=https://datasheet.octopart.com/STM32L433RCT6-STMicroelectronics-datasheet-62336854.pdf?src-supplier=Future+Electronics, ComponentLink6Description=https://datasheet.octopart.com/STM32L433RCT6-STMicroelectronics-datasheet-82526589.pdf?src-supplier=SHENGYU+ELECTRONICS, ComponentLink6URL=https://datasheet.octopart.com/STM32L433RCT6-STMicroelectronics-datasheet-82526589.pdf?src-supplier=SHENGYU+ELECTRONICS, Item Type=IC, Manufacturer Part Number=STM32L433RCT6, Pricing 1="1=6.19, 10=5.59, 50=5.33, 100=4.63, 1000=3.46, 10000=3.46 (USD)", RoHS=Yes, Stock 1=2188, Supplier 1=Mouser
X1: library part FW4000044Q, "Crystal 40.0000MHZ 8PF SMD", ESR (Equivalent Series Resistance)=50R, Frequency=40MHz, Load Capacitance=8pF, Manufacturer=Diodes, Max Operating Temperature=125°C, Min Operating Temperature=-40°C, Supplier Part Number=FW4000044QDICT-ND, Tolerance=0.001%, ComponentLink1Description=https://www.diodes.com/assets/Datasheets/FW.pdf?src-supplier=Digikey, ComponentLink1URL=https://www.diodes.com/assets/Datasheets/FW.pdf?src-supplier=Digikey, Height=550um, Item Type=Crystals, Manufacturer Part Number=FW4000044Q, Pricing="1=0.76, 10=0.669, 50=0.6254, 100=0.5527, 500=0.52358, 1000=0.43632 (USD)", RoHS=No, Stock=15600, Supplier=Digikey
X2: library part ECS-.327-12.5-16-TR, "CRYSTAL 32.7680KHZ 12.5PF SMD", Manufacturer="ECS International", Category=Crystals, ComponentLink1Description=https://datasheet.octopart.com/ECS-.327-12.5-16-TR-ECS-International-datasheet-14433430.pdf?src-supplier=Future+Electronics, ComponentLink1URL=https://datasheet.octopart.com/ECS-.327-12.5-16-TR-ECS-International-datasheet-14433430.pdf?src-supplier=Future+Electronics, ComponentLink2Description=http://www.ecsxtal.com/store/pdf/ECX-16.pdf?src-supplier=Digikey, ComponentLink2URL=http://www.ecsxtal.com/store/pdf/ECX-16.pdf?src-supplier=Digikey, ComponentLink3Description=http://www.ecsxtal.com/store/pdf/partnumber4.pdf?src-supplier=Digikey, ComponentLink3URL=http://www.ecsxtal.com/store/pdf/partnumber4.pdf?src-supplier=Digikey, ComponentLink4Description=https://datasheet.octopart.com/ECS-.327-12.5-16-TR-ECS-International-datasheet-130008819.pdf?src-supplier=Master+Electronics, ComponentLink4URL=https://datasheet.octopart.com/ECS-.327-12.5-16-TR-ECS-International-datasheet-130008819.pdf?src-supplier=Master+Electronics, Item Type=Crystal, Manufacturer Part Number=ECS-.327-12.5-16-TR, Pricing="5000=0.403 (USD)", RoHS=Yes, Stock=20000, Supplier=Avnet, Supplier Part Number=ECS-.327-12.5-16-TR
X3: library part ECS-80-12-33-JGN-TR, "CRYSTAL 8.0000MHZ 12PF SMD", Manufacturer="ECS International", ComponentLink1Description=https://datasheet.octopart.com/ECS-80-12-33-JGN-TR-ECS-International-datasheet-140089731.pdf?src-supplier=Future+Electronics, ComponentLink1URL=https://datasheet.octopart.com/ECS-80-12-33-JGN-TR-ECS-International-datasheet-140089731.pdf?src-supplier=Future+Electronics, ComponentLink2Description=https://datasheet.octopart.com/ECS-80-12-33-JGN-TR-ECS-International-datasheet-17018741.pdf?src-supplier=Master+Electronics, ComponentLink2URL=https://datasheet.octopart.com/ECS-80-12-33-JGN-TR-ECS-International-datasheet-17018741.pdf?src-supplier=Master+Electronics, Item Type=Crystal, Manufacturer Part Number=ECS-80-12-33-JGN-TR, Pricing="1000=0.27283 (USD)", RoHS=No, RoHS Compliant=Yes, Stock=58000, Supplier=Avnet, Supplier Part Number=ECS-80-12-33-JGN-TR

## Via types
v1: diameter 18, hole 8, Top Layer to Bottom Layer, tented both sides, 224 vias
v2: diameter 23.62, hole 11.81, Top Layer to Bottom Layer, tented both sides, 59 vias
v3: diameter 19.68, hole 11.81, Top Layer to Bottom Layer, tented both sides, 3 vias

## Nets (pads, with @x,y where several pads share a name; then routed paths per layer and width w, separated by ;. In a path a pad name is that pad's centre, name@x,y a point inside that pad or via, vN(x,y) a via of type N, cw(c..) or ccw(c..) an arc to the next point about the centre after c; other vN are vias at no path point)
1V8_LDO: C20.2 J4.10 TP10.1 U8.1 | length 1873.1
  Top Layer w20: v2(1495,602.87) 1495.98,602.87 1505.48,612.36 TP10.1@1647.09,612.36
  Mid Layer 1 w12: v1(502,159.5) 502,159 556.45,104.55 1408.55,104.55 1515.02,211.02 1515.02,582.84 v2(1495,602.87)
  Bottom Layer w12: C20.2@398.69,329.12 398.69,262.31 501.5,159.5 v1(502,159.5)
  Bottom Layer w20: v2(1495,602.87) J4.10@1495,626.92
3V3: C95.2 C96.2 C97.2 C98.2 C102.1 C103.2 C104.2 C105.2 R8.2 SW6.3 U13.1 U13.13 U13.19 U13.32 U13.48 U13.64 | length 779.2
  Top Layer w8: U13.19@1080.89,1268.99 1081.23,1268.65 1081.23,1232.55 v1(1081.58,1232.21) ; v1(1118.07,1119.1) 1143.26,1119.1 1155.35,1131.2 U13.13@1199,1131.2 ; U13.64@1120.26,816.24 v1(1120.26,898.81) ; v1(1147.18,894.8) 1198.82,894.8 U13.1@1199,894.98
  Top Layer w10: U13.48@746.24,894.98 763.96,894.98 773.86,885.08 v1(775.1,885.08)
  Top Layer w12: v2(811.45,1222.67) 824.98,1236.2 U13.32@824.98,1268.99
  Top Layer w25: SW6.3@1175.85,1369.35 v2(1175.85,1409)
  Bottom Layer w10: R8.2@-31.55,1524.77 -27.77,1524.77 -27.77,1525.06 -3.99,1548.84 v2(95.75,1548.84) ; C104.2@749.96,892.45 765.56,892.45 772.94,885.08 v1(775.1,885.08) ; v1(1118.07,1119.1) 1119.6,1120.63 1144.45,1120.63 1146,1122.18 1187.78,1122.18 C103.2@1188,1122.4 ; C98.2@1119.98,870.88 1120.12,871.02 v1@1120.12,898.67 ; v1(1120.26,898.81) 1121.79,897.28 1142.54,897.28 1145.02,894.8 v1(1147.18,894.8) 1147.23,894.84 1198.77,894.84 C105.2@1199,895.07
  Bottom Layer w12: C97.2@797.98,1268.99 797.98,1236.14 v2(811.45,1222.67)
3V3_LDO: C19.2 C21.2 C107.2 D1.1 J4.8 LED3.1 LED3.3 LED3.5 TP3.1 TP9.1 U7.1 U8.3 U8.4 | length 3419.1
  Top Layer w25: v1(1422.38,1290.99) LED3.1@1465.89,1290.99 1531.01,1290.99 1594,1228 LED3.5@1654.87,1228 ; v2(1497.39,1035.81) TP9.1@1647.09,1035.81
  Mid Layer 1 w10: v1(922.69,80.67) 1562.67,80.67 1644,162 1644,889.2 v2(1497.39,1035.81)
  Mid Layer 1 w25: v2(1388.37,720) 1388.37,787.37 1497.39,896.39 v2(1497.39,1035.81)
  Bottom Layer w10: 323.78,365.14 323.78,141.5 345.28,120 792.96,120 832.29,80.67 v1(922.69,80.67)
  Bottom Layer w25: v2(1388.37,720) 1414.78,720 1429.12,705.66 J4.8@1495,705.66
  other v2: 1451.11,1121
5V_BST: C7.2 C8.2 C9.2 TP6.1 U1.6 U4.3 U4.4 U4.7 | length 269.6
  Top Layer w20: v2(-150,1346.85) TP6.1@-65.22,1431.63
  Bottom Layer w10: v1(-69.53,1096.01) U4.7@-39.15,1096.01 ; U1.6@814.69,1125.29 847.86,1125.29 851.68,1121.47 853.12,1121.47 889.15,1085.45 v2(917.5,1085.45)
  other v1: 135.24,889.56
5V_IN: C18.1 C26.2 C27.2 C28.2 C29.2 C52.2 C53.1 Q2.5 Q2.6 Q2.7 Q2.8 R2.2 R16.1 TP8.1 U7.4 U9.9 U9.13 U9.22 U9.26 | length 130
  Top Layer w12: R2.2@-83.26,822.07 -4.44,822.07 v2(-4.15,821.78)
  Top Layer w22: v2(531,752.68) TP8.1@531,803.41
  other v2: 81.66,303.36 145.44,740.53 406.31,740.53 352,1021.41 165.54,1028.67
5V_IN#: Q2.1 Q2.2 Q2.3 R38.2 TP7.1 U1.2 U1.7 U2.6 | length 501.6
  Bottom Layer w10: v2(643.81,716.16) 643.81,822.32 734.74,913.25 734.74,1004.54 734.62,1004.66 734.62,1095.95 742.98,1104.31 755.51,1104.31 U1.2@756.81,1105.61 U1.7@814.69,1105.61
  other v1: 2.49,572.86 2.49,601.01
  other v2: -69,356